# Altium PCB PCB1.PcbDoc
Units mm, origin at the board's own origin, x right, y up, seen from the top; angles counter-clockwise.
Board outline 55.25 x 50.25 mm, 4 copper layers (Top Layer 1, Top Layer, Bottom Layer, Bottom Layer 1), stack 0.742 mm thick; 31 components, 28 nets, 128 pads, 32 vias.
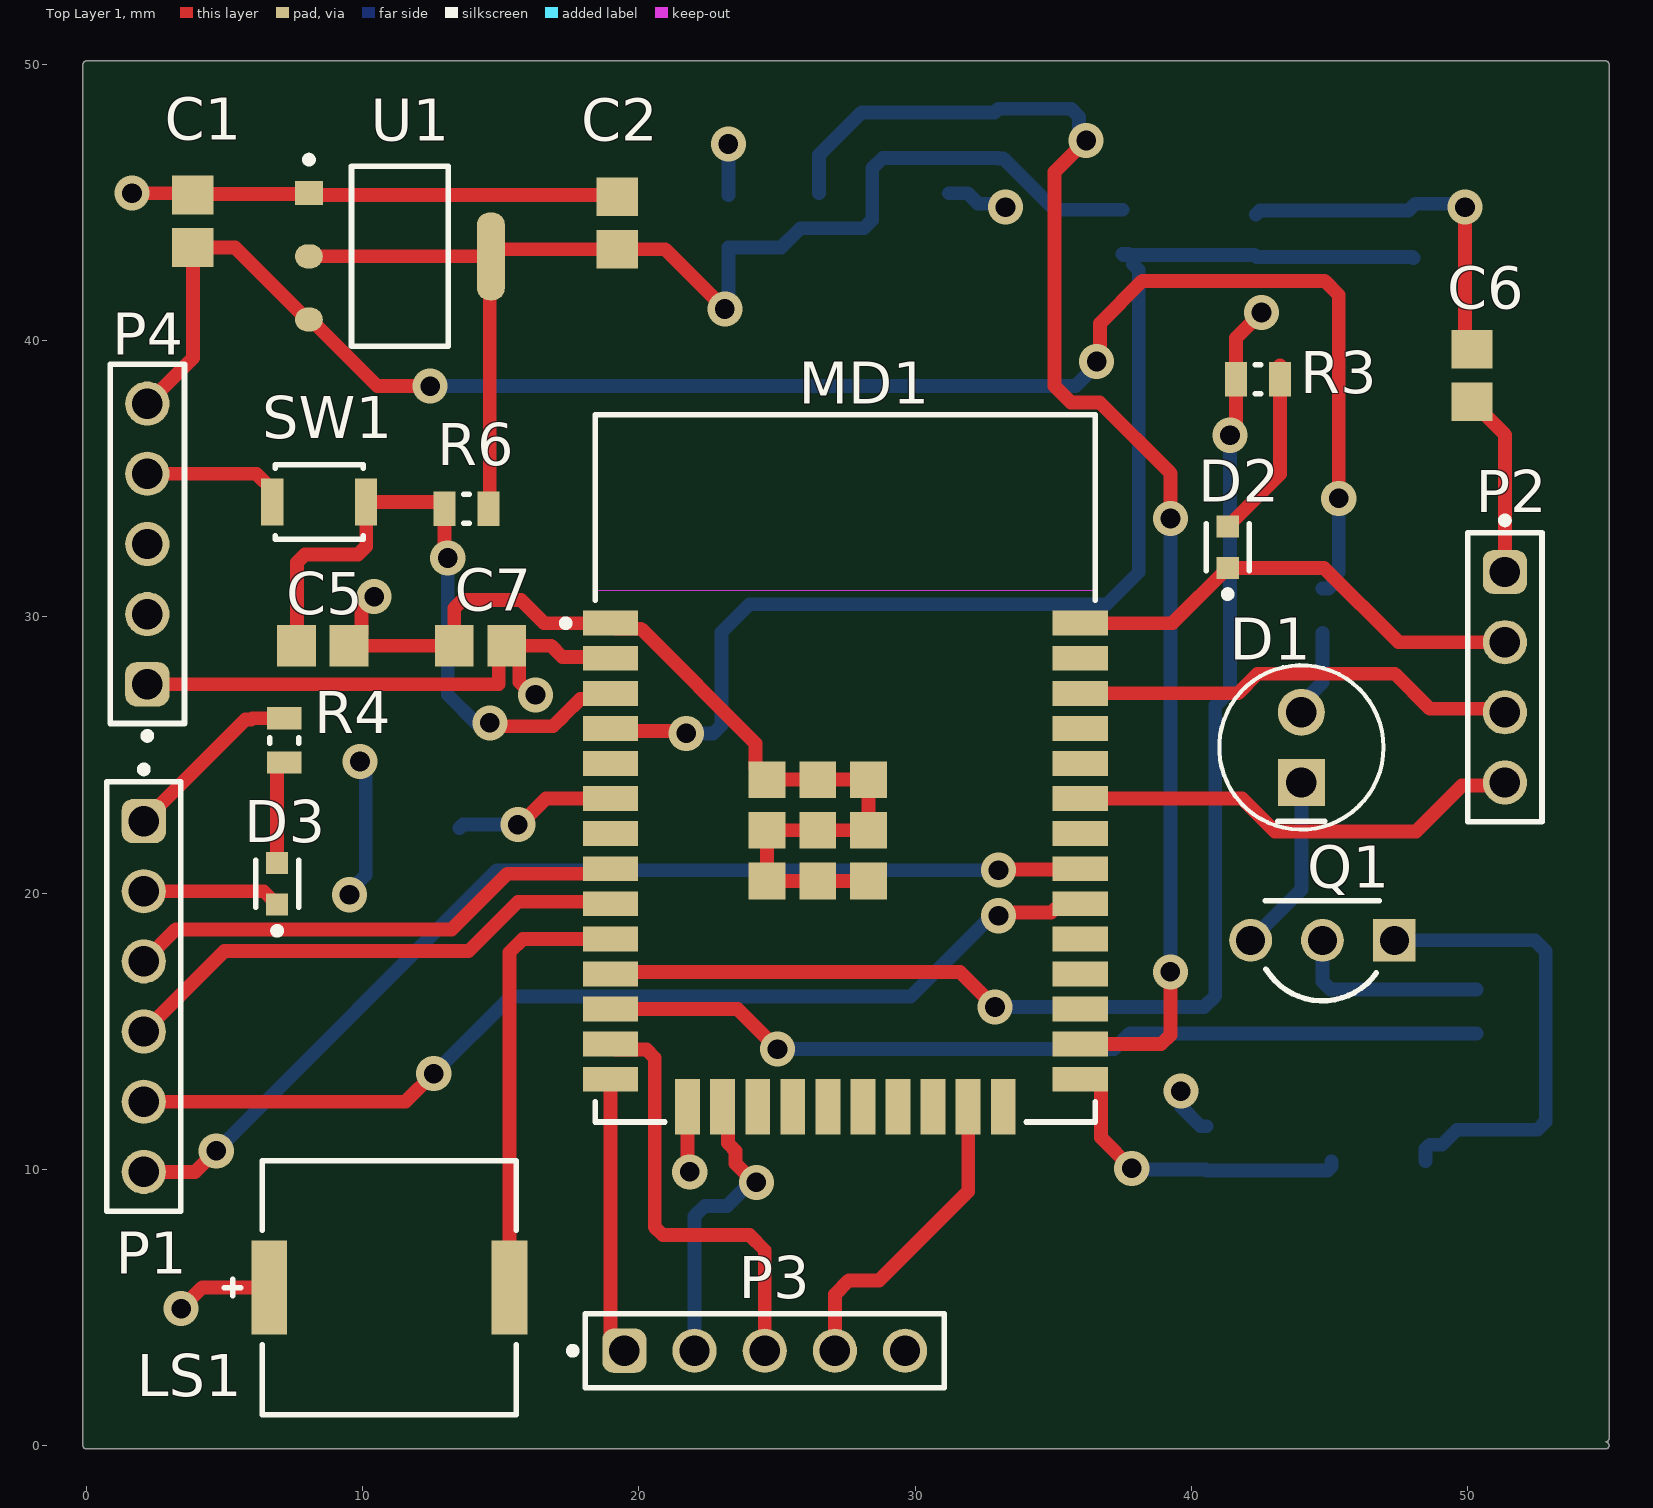
[diagram p0: Top Layer 1 view]
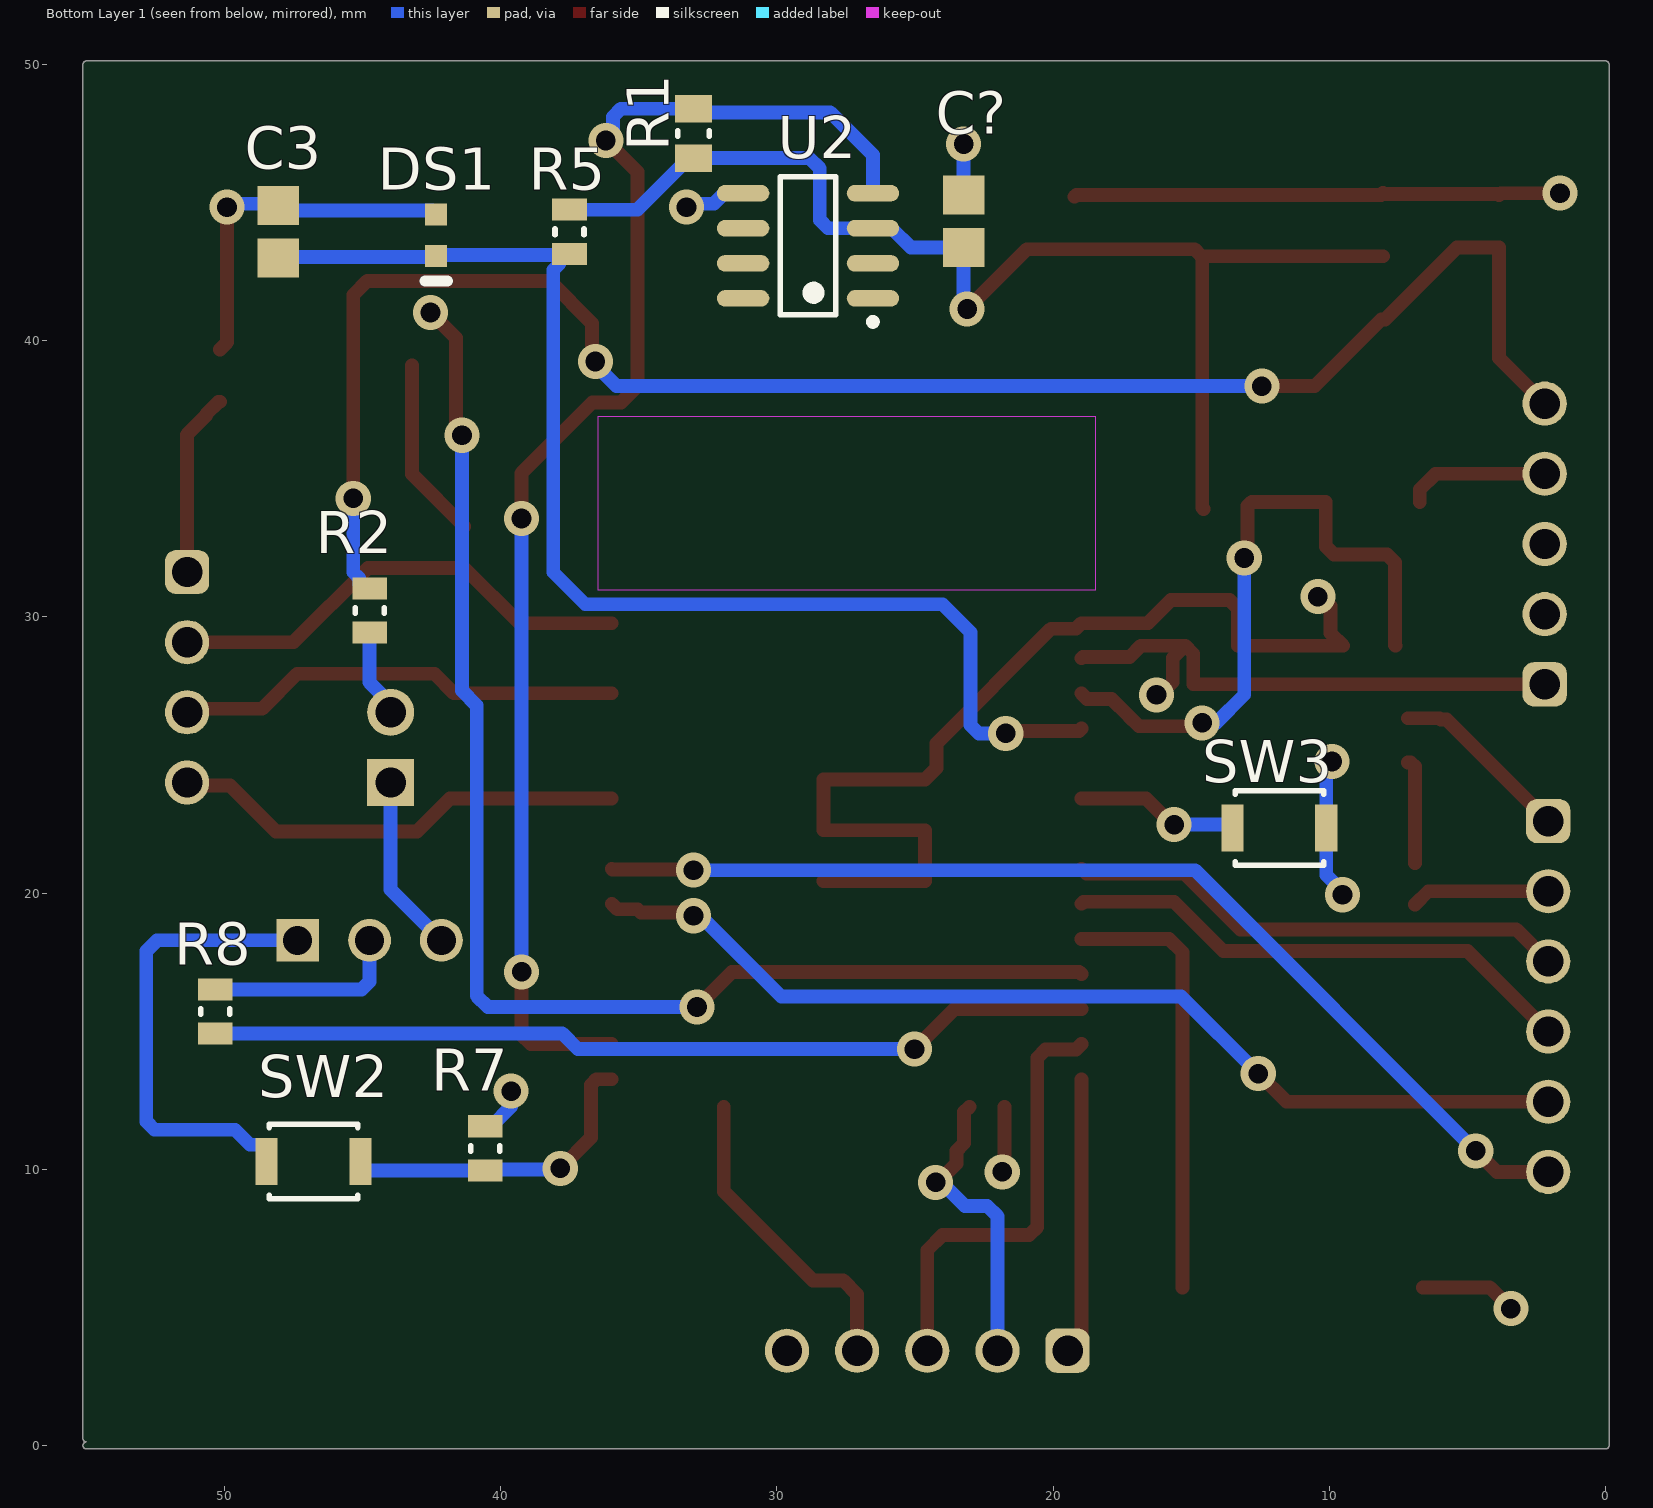
[diagram p1: Bottom Layer 1 view, seen from below]
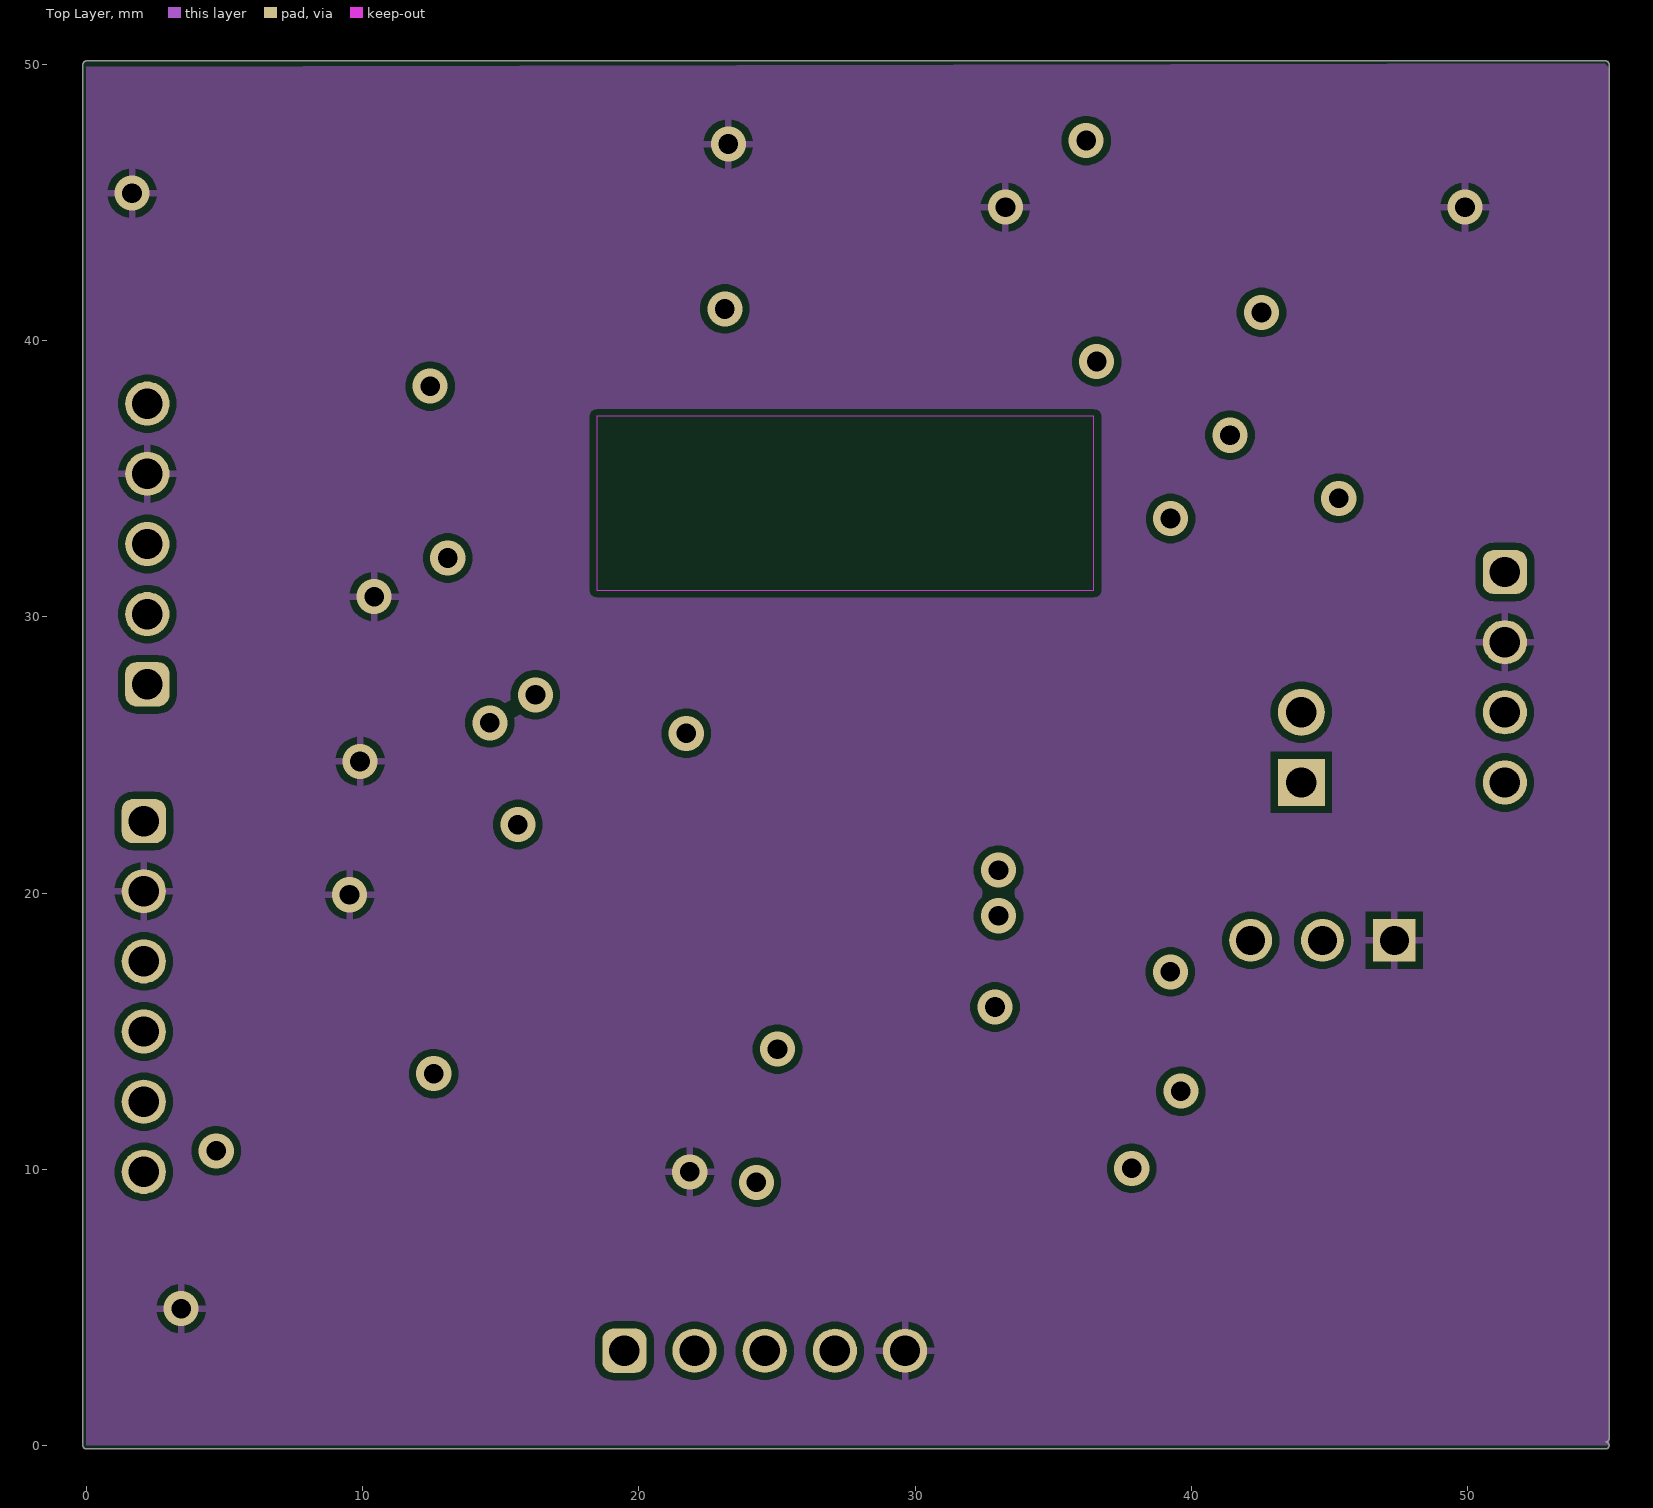
[diagram p2: Top Layer]
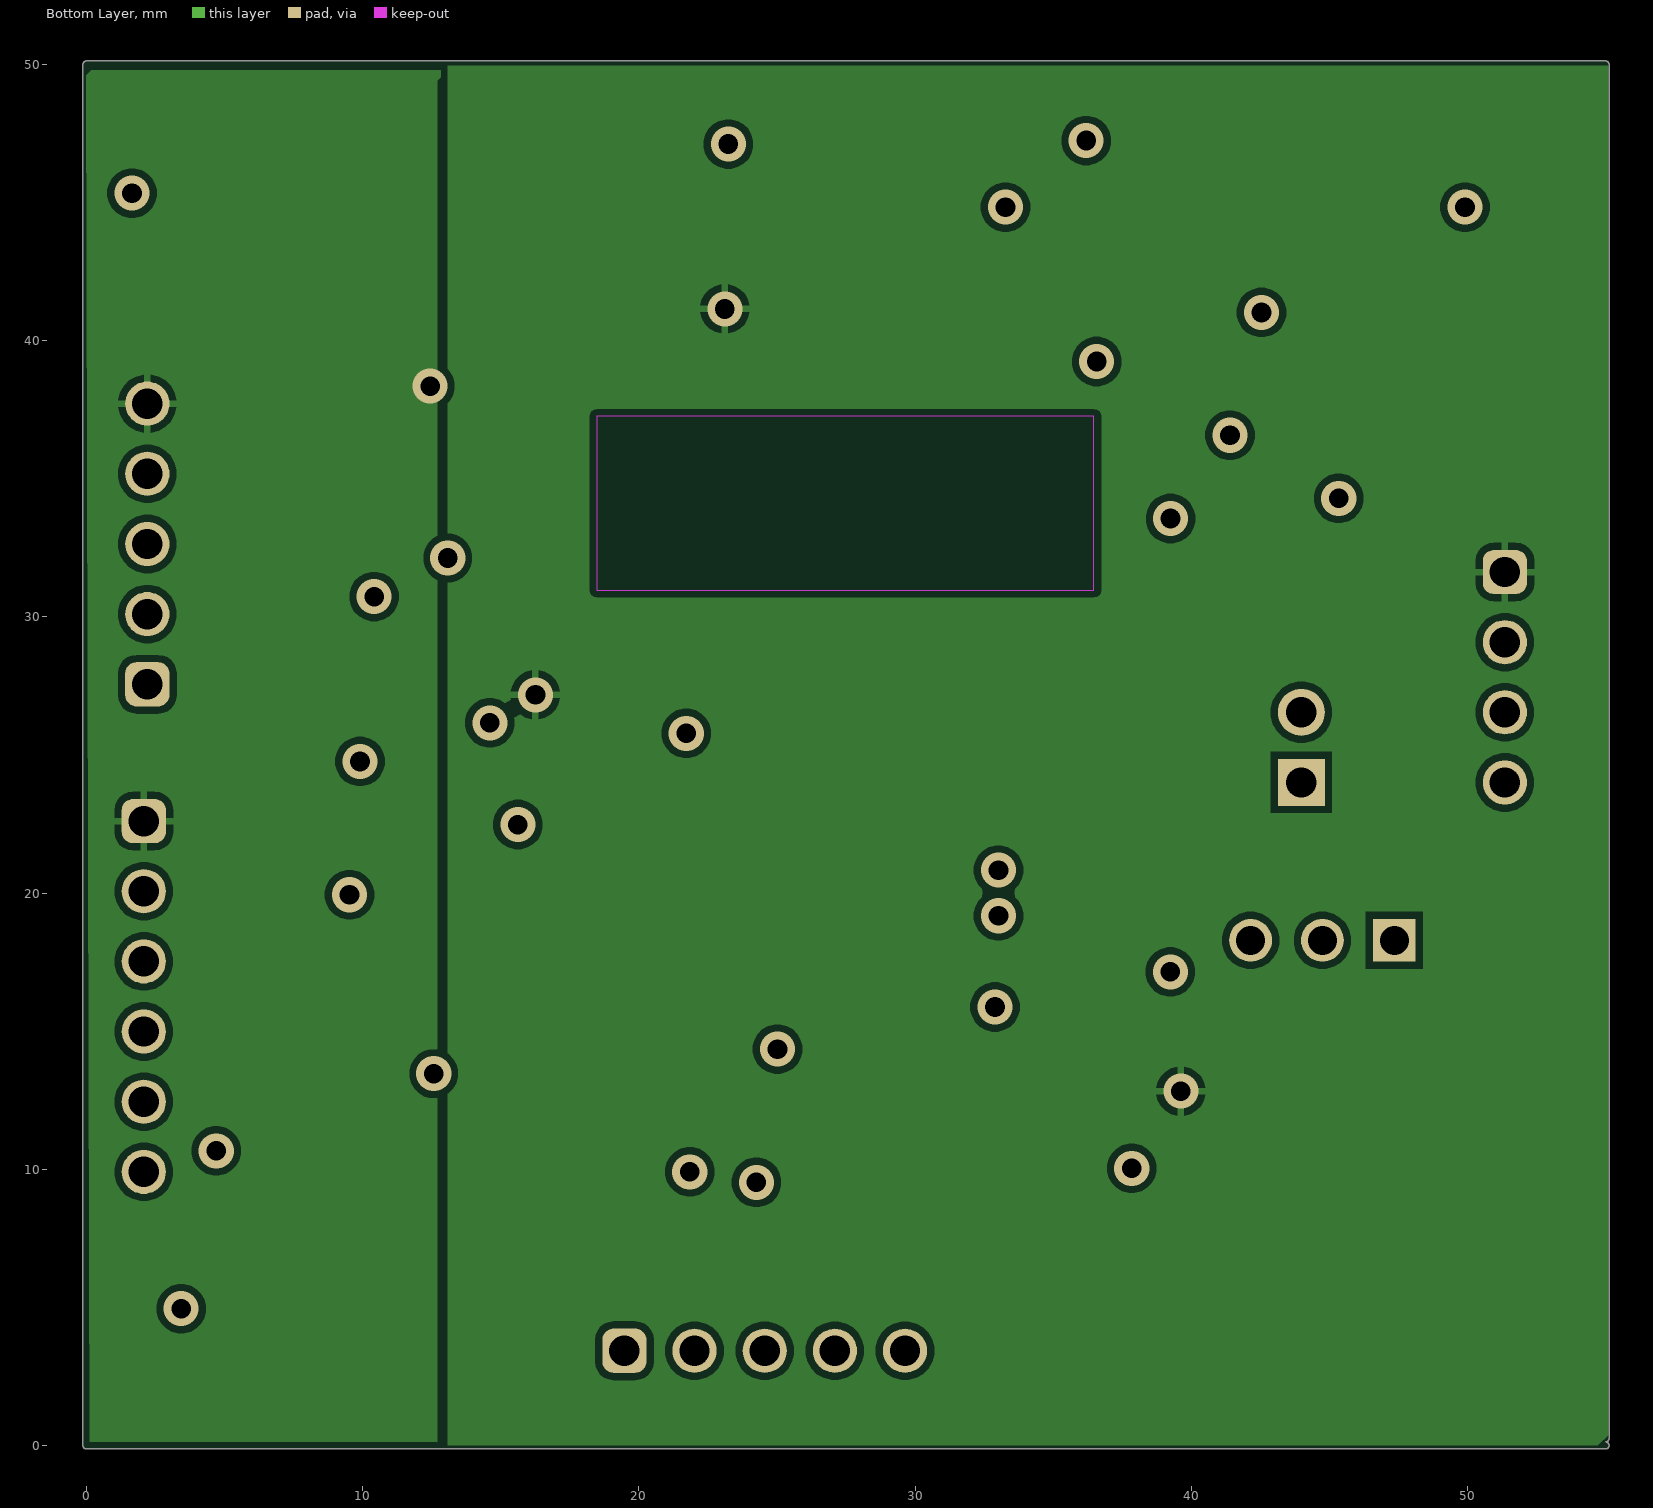
[diagram p3: Bottom Layer]
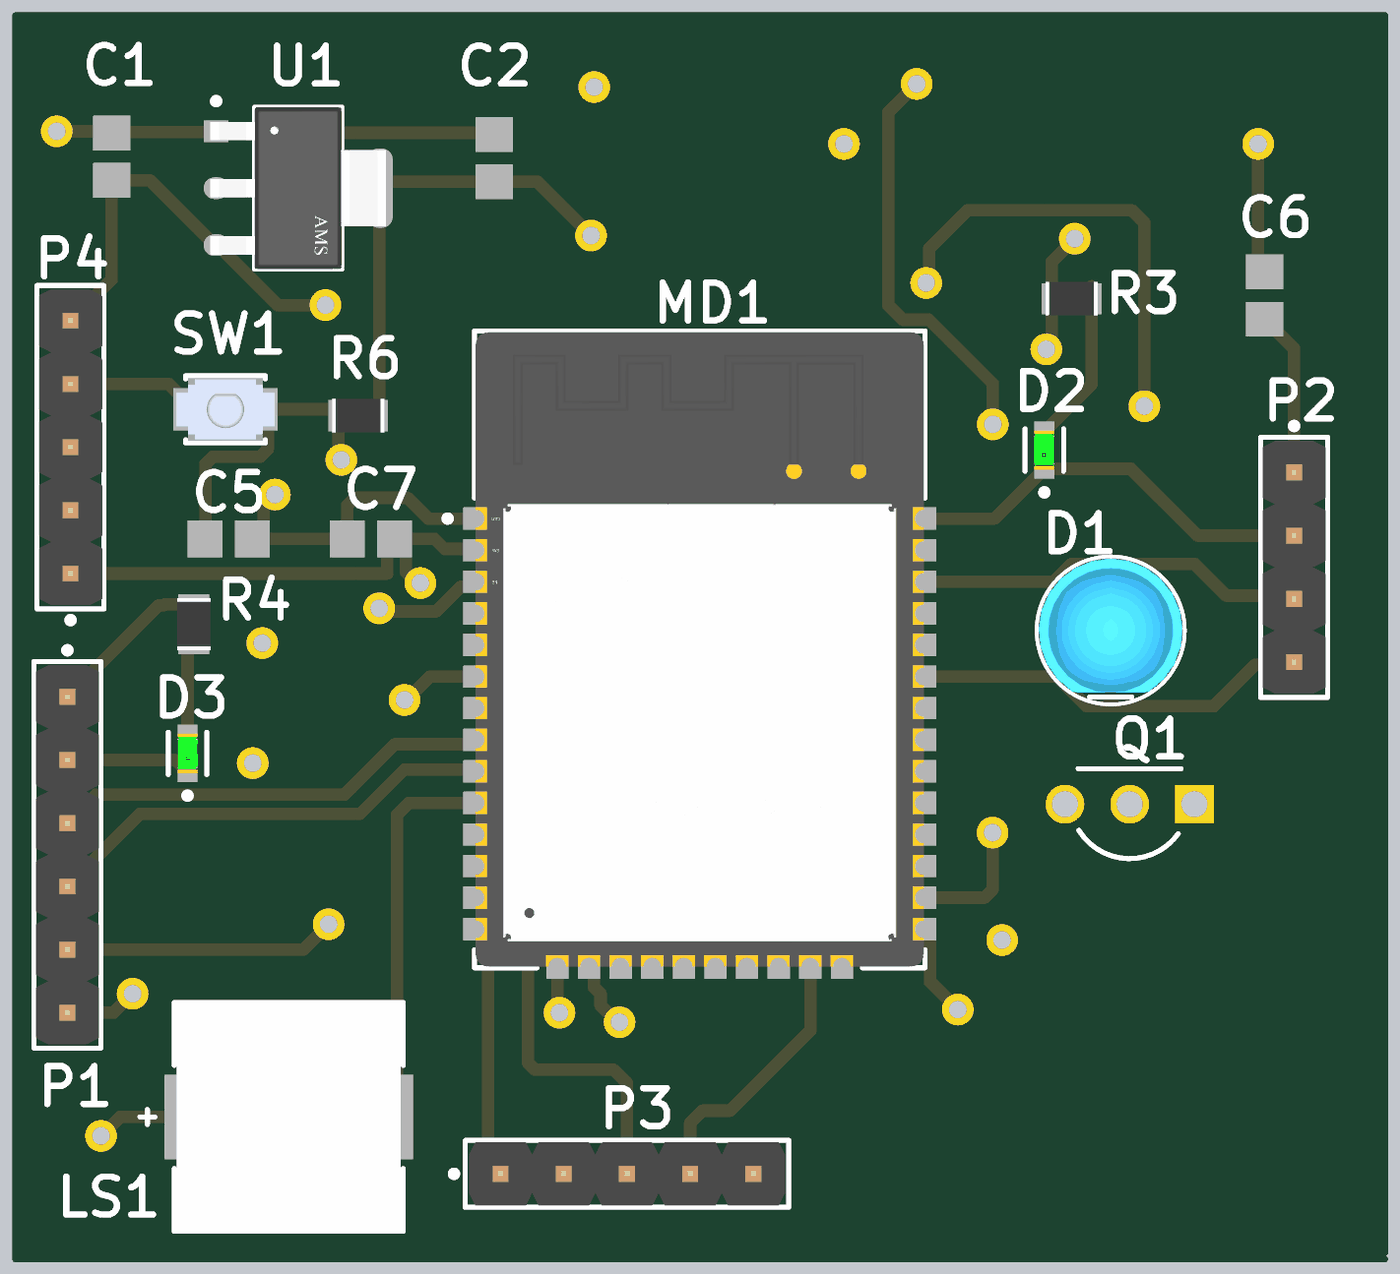
[diagram p4: 3D render of the assembled board from above, using the file's embedded part models]
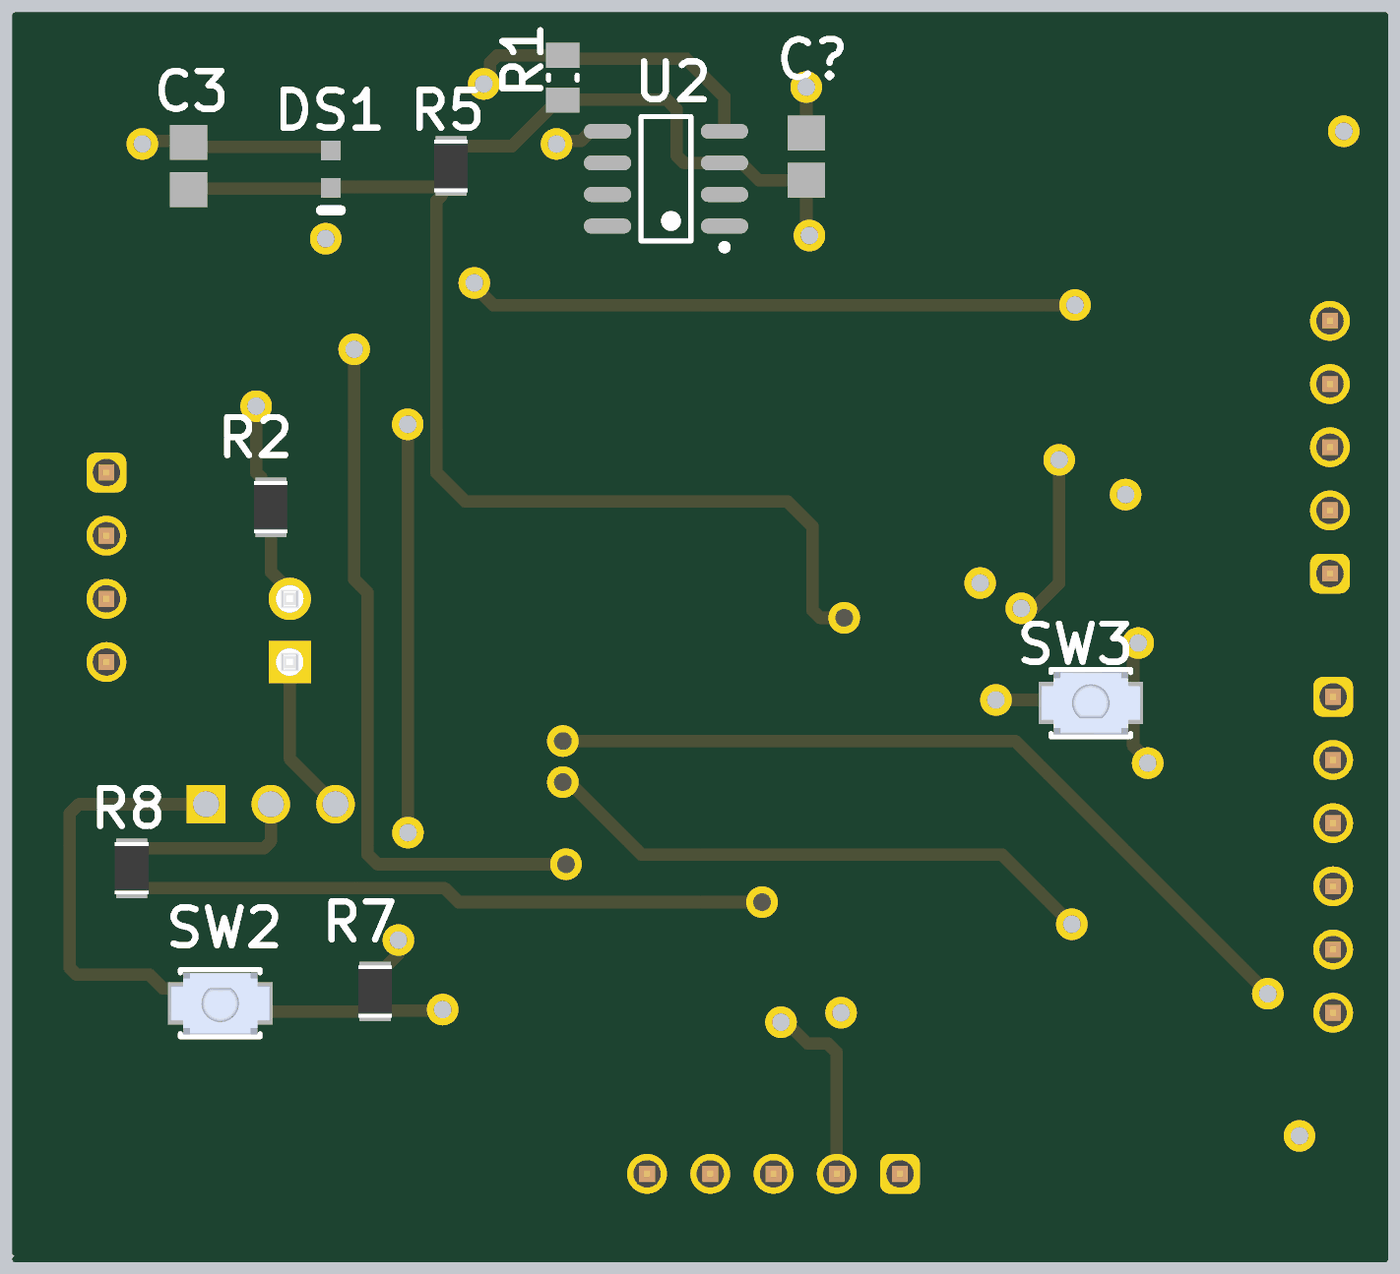
[diagram p5: 3D render of the assembled board from below, using the file's embedded part models]

## Layer stack, top to bottom
Top Solder: solder mask 0.0102, Solder Resist, Dk 3.5
Top Layer 1: signal copper 0.07
Dielectric 2: prepreg 0.0711, PP-006, Dk 4.1
Top Layer: signal copper 0.07
Dielectric 1: dielectric 0.32, FR-4, Dk 4.8
Bottom Layer: signal copper 0.07
Dielectric 3: prepreg 0.0711, PP-006, Dk 4.1
Bottom Layer 1: signal copper 0.07
Bottom Solder: solder mask 0.0102, Solder Resist, Dk 3.5

## Board outline
0,-0.127 cw(c0,0) -0.127,0 -0.127,50 cw(c0,50) 0,50.127 55,50.127 cw(c55,50) 55.127,50 55.127,0.254 cw(c55,0.254) 55.01,0.127 cw(c55,0) 55.127,0 cw(c55,0) 55,-0.127

## Design rules (kind name [scope] priority, off if disabled: settings)
Clearance [All] p1: gap=0.254 ignorepadtopadclearanceinfootprint=FALSE
PolygonConnect [All] p1: connectstyle=Relief reliefconductorwidth=0.254 reliefentries=4 polygonreliefangle="90 Angle" airgapwidth=0.254
RoutingVias [All] p1: holewidth=0.711 width=1.27 viastyle="Through Hole" minholewidth=0.711 minwidth=1.27 maxholewidth=0.711 maxwidth=1.27
SolderMaskExpansion [All] p1: expansion=0 istentingtop=FALSE
SupplyNets "Schematic Supply Nets_2" [InNet('+5')] p1: voltage=0.000
SupplyNets "Schematic Supply Nets_1" [InNet('+3.3')] p2: voltage=0.000
SupplyNets "Schematic Supply Nets" [InNet('GND')] p3: voltage=0.000
Width [All] p1: maxlimit=5 minlimit=0.254 preferedwidth=0.5
30 further rules are at their usual default settings.

## Components (designator, comment, footprint, x,y, rotation, side; value= is the part's Value field where it differs from the comment)
C1 "0.1uF" CAPC2013X135X45ML10T25 3.856,44.323 r90 top
C2 "0.1uF" CAPC2013X135X45ML10T25 19.223,44.262 r90 top
C3 "0.1uF" CAPC2013X135X45ML10T25 48.052,43.942 r270 bottom
C5 "0.1uF" CAPC2013X135X45ML10T25 8.555,28.956 r0 top
C6 "0.1uF" CAPC2013X135X45ML10T25 50.165,38.735 r90 top
C7 "0.1uF" CAPC2013X135X45ML10T25 14.27,28.956 r0 top
C? "0.1uF" CAPC2013X135X45ML10T25 23.241,44.323 r270 bottom
D1 "TSAL6100" FP-6_544-5259_08-4-MFG 43.988,25.273 r90 top
D2 "LTST-C193KGKT-5A" FP-LTST-C193KGKT-5A-MFG 41.321,32.524 r90 top
D3 "LTST-C193KGKT-5A" FP-LTST-C193KGKT-5A-MFG 6.904,20.332 r90 top
DS1 "LTST-C190AKT" LTST-C190AKT-2_V 42.337,43.815 r270 bottom
LS1 "PKMCS0909E4000-R1" FP-PKMCS-MFG 10.968,5.715 r180 top
MD1 "ESP32-WROOM-32" FP-ESP32-WROOM-32-MFG 27.478,24.511 r0 top
P1 "61300611121" 61300611121 2.078,16.256 r270 top
P2 "61300411121" 61300411121 51.354,27.813 r270 top
P3 "61300511121" 61300511121 24.557,3.429 r0 top
P4 "61300511121" 61300511121 2.205,32.639 r90 top
Q1 "PN2222ATF" FAIR-TO-92-3 44.75,18.288 r180 top
R1 "4.7k" RESC2013X60X35NL10T20 33.02,47.498 r90 bottom
R2 "330" RESC2013X60X35LL10T20 44.75,30.226 r90 bottom
R3 "330" RESC2013X60X35LL10T20 42.418,38.608 r180 top
R4 "330" RESC2013X60X35LL10T20 7.158,25.527 r90 top
R5 "10k" RESC2013X60X35LL10T20 37.511,43.942 r90 bottom
R6 "10k" RESC2013X60X35LL10T20 13.762,33.909 r180 top
R7 "10k" RESC2013X60X35LL10T20 40.559,10.757 r270 bottom
R8 "1k" RESC2013X60X35LL10T20 50.338,15.71 r270 bottom
SW1 "B3U-1000P" FP-B3U-1000P-MFG 8.428,34.163 r0 top
SW2 "B3U-1000P" FP-B3U-1000P-MFG 46.782,10.287 r180 bottom
SW3 "B3U-1000P" FP-B3U-1000P-MFG 11.811,22.352 r0 bottom
U1 "AMS1117-3.3" FP-AMS1117-IPC_C 11.349,43.053 r0 top
U2 "DS18B20Z+" MAXM-S8+2_L 28.875,43.434 r0 bottom

## Footprints (in the part's own frame and the unit in brackets; to place one, negate y for a bottom-side part, rotate by r counter-clockwise, add the part's x,y. Pads: shape width x height; smd on the part's side, far side on the other; paste and mask are expansions set on the pad)
61300411121 [mm] "Pin Header, pitch 2.54 mm, THT, Vertical, single row, 4p"
  rrect50% 1.6x1.6 hole 1.1: 1(-3.81,0)
  round 1.6 hole 1.1: 2(-1.27,0) 3(1.27,0) 4(3.81,0)
  silkscreen extent -5.8,-1.35 5.23,1.35, body extent -5.08,-1.27 5.08,1.27, height 8.57
61300511121 [mm] "Pin Header, pitch 2.54 mm, THT, Vertical, single row, 5p"
  rrect50% 1.6x1.6 hole 1.1: 1(-5.08,0)
  round 1.6 hole 1.1: 2(-2.54,0) 3(0,0) 4(2.54,0) 5(5.08,0)
  silkscreen extent -7.07,-1.35 6.5,1.35, body extent -6.35,-1.27 6.35,1.27, height 8.57
61300611121 [mm] "Pin Header, pitch 2.54 mm, THT, Vertical, single row, 6p"
  rrect50% 1.6x1.6 hole 1.1: 1(-6.35,0)
  round 1.6 hole 1.1: 2(-3.81,0) 3(-1.27,0) 4(1.27,0) 5(3.81,0) 6(6.35,0)
  silkscreen extent -8.34,-1.35 7.77,1.35, body extent -7.62,-1.27 7.62,1.27, height 8.57
CAPC2013X135X45ML10T25 [mm] "Chip Capacitor, 2-Leads, Body 2.10x1.35mm, IPC Low Density"
  rect 1.4x1.5 smd: 1(-0.95,0) 2(0.95,0)
  body extent -1.05,-0.67 1.05,0.67, height 1.35
FAIR-TO-92-3 [mm] "TO, 3-Leads, Body Dia 4.79mm, Pitch 2.6mm"
  rect 1.55x1.55 hole 1.05: 1(-2.6,0)
  round 1.55 hole 1.05: 2(0,0) 3(2.6,0)
  silkscreen extent -2.07,-1.43 2.07,2.19, body extent -2.4,-1.47 2.4,2.2, height 8.49
FP-6_544-5259_08-4-MFG [mm]
  rect 1.7x1.7 hole 1.1 paste-2539.97 mask+0: 1(-1.27,0)
  round 1.7 hole 1.1 paste-2539.97 mask+0: 2(1.27,0)
  silkscreen extent -2.97,-2.98 2.97,2.97, body extent -3.08,-3.08 3.08,3.08, height 0.25
FP-AMS1117-IPC_C [mm]
  rect 1.004x0.872 smd paste+0 mask+0: 1(-3.295,2.29)
  rrect100% 1.004x0.872 smd paste+0 mask+0: 2(-3.295,0) 3(-3.295,-2.29)
  rrect87% 1.004x3.182 smd paste+0 mask+0: 4(3.295,0)
  silkscreen extent -3.42,-3.25 1.75,3.62, body extent -3.9,-3.35 3.9,3.35, height 0.25
FP-B3U-1000P-MFG [mm]
  rect 0.8x1.7 smd paste+0 mask+0: 1(-1.7,0) 2(1.7,0)
  silkscreen extent -1.6,-1.35 1.6,1.35, body extent -2.2,-1.45 2.2,1.45, height 0.25
FP-ESP32-WROOM-32-MFG [mm]
  rect 2x0.9 smd paste+0 mask+0: 1(-8.5,5.26) 2(-8.5,3.99) 3(-8.5,2.72) 4(-8.5,1.45) 5(-8.5,0.18) 6(-8.5,-1.09) 7(-8.5,-2.36) 8(-8.5,-3.63) 9(-8.5,-4.9) 10(-8.5,-6.17) 11(-8.5,-7.44) 12(-8.5,-8.71) 13(-8.5,-9.98) 14(-8.5,-11.25) 25(8.5,-11.25) 26(8.5,-9.98) 27(8.5,-8.71) 28(8.5,-7.44) 29(8.5,-6.17) 30(8.5,-4.9) 31(8.5,-3.63) 32(8.5,-2.36) 33(8.5,-1.09) 34(8.5,0.18) 35(8.5,1.45) 36(8.5,2.72) 37(8.5,3.99) 38(8.5,5.26)
  rect 0.9x2 smd paste+0 mask+0: 15(-5.715,-12.25) 16(-4.445,-12.25) 17(-3.175,-12.25) 18(-1.905,-12.25) 19(-0.635,-12.25) 20(0.635,-12.25) 21(1.905,-12.25) 22(3.175,-12.25) 23(4.445,-12.25) 24(5.715,-12.25)
  rect 1.33x1.33 smd paste+0 mask+0: 39(-2.835,-4.075) 39(-2.835,-2.24) 39(-2.835,-0.405) 39(-1,-4.075) 39(-1,-2.24) 39(-1,-0.405) 39(0.835,-4.075) 39(0.835,-2.24) 39(0.835,-0.405)
  Keep-Out Layer region: -9,6.45 9,6.45 9,12.75 -9,12.75
  Keep-Out Layer region: -9,6.45 9,6.45 9,12.75 -9,12.75
  silkscreen extent -10.25,-12.8 9.05,12.8, body extent -9.6,-13.35 9.6,12.9, height 0.25
FP-LTST-C193KGKT-5A-MFG [mm]
  rect 0.8x0.8 smd paste+0 mask+0: 1(-0.75,0) 2(0.75,0)
  silkscreen extent -1.82,-0.77 0.85,0.77, body extent -1.25,-0.55 1.25,0.55, height 0.25
FP-PKMCS-MFG [mm]
  rect 1.3x3.4 smd paste+0 mask+0: 1(-4.35,0) 2(4.35,0)
  silkscreen extent -4.6,-4.6 5.97,4.6, body extent -5.1,-4.7 5.1,4.7, height 0.25
LTST-C190AKT-2_V [mm] "SMD, 2-Leads, Body 1.6x0.8mm"
  rect 0.8x0.8 smd: 1(-0.75,0) 2(0.75,0)
  silkscreen extent 1.65,-0.4 1.65,0.4, body extent -0.8,-0.4 0.8,0.4, height 0.8
MAXM-S8+2_L [mm] "SOIC, 8-Leads, Body 4.90x3.90mm, Pitch 1.27mm, IPC High Density"
  oval 1.9x0.6 smd: 1(-2.35,1.905) 2(-2.35,0.635) 3(-2.35,-0.635) 4(-2.35,-1.905) 5(2.35,-1.905) 6(2.35,-0.635) 7(2.35,0.635) 8(2.35,1.905)
  silkscreen extent -2.47,-2.5 1,2.88, body extent -2,-2.5 2,2.5, height 1.75
RESC2013X60X35LL10T20 [mm] "Chip Resistor, 2-Leads, Body 2.1x1.35mm, IPC High Density"
  rect 0.8x1.25 smd: 1(-0.8,0) 2(0.8,0)
  silkscreen extent -0.1,-0.53 0.1,0.53, body extent -1.05,-0.67 1.05,0.68, height 0.6
RESC2013X60X35NL10T20 [mm] "Chip Resistor, 2-Leads, Body 2.00x1.25mm, IPC Medium Density"
  rect 1x1.35 smd: 1(-0.9,0) 2(0.9,0)
  silkscreen extent -0.1,-0.58 0.1,0.58, body extent -1.05,-0.67 1.05,0.67, height 0.6

## Part data
C1 C2 C3 C5 C6 C7 C?: library part CMP-2000-04946-1, "Multilayer Ceramic Capacitor, 1 uF, +/- 10%, 16 V, -55 to 125 degC, 0805 (2012 Metric), RoHS, Tape and Reel", Capacitance=1µF, Case Size/Dimension=0805, Dielectric=X7R, Manufacturer=Murata, Package Description="2-Pin Surface Mount Device, Body 2 x 1.25 mm", Package Reference=805, Rated Voltage=16V, Tolerance (%)=±10%, Datasheet URL=https://datasheet.ciiva.com/34302/1858922-34302874.pdf, Datasheet Version=Mar-08, Manufacturer URL=http://www.murata.com/
D1: library part CMP-02520-000005-1, "EMITTER IR 940NM 100MA RADIAL", Ambient Temperature Range High=+85°C, Ambient Temperature Range Low=-40°C, Colour=Infrared, Forward Current=100mA, Forward Voltage=1.35V, Manufacturer=Vishay, Max Junction Temp=+100°C, Package=6.544-5259.08-4, Power Dissipation=160mW, Reverse Voltage=5V, Temperature="-40°C to +85°C", Automotive=No, Category=Diode, ComponentLink2Description=Datasheet, ComponentLink2URL=http://www.vishay.com/docs/81009/tsal6100.pdf, Device Class L1=Optoelectronics, Device Class L2=LEDs, Device Class L3=unset, Digikey Description="EMITTER IR 940NM 100MA RADIAL", Ipc Land Pattern Name=DIORD254W110D580H900, Lead Free=Yes, Led Orientation=Straight, Manufacturer Part Number=TSAL6100, Mouser Description="TSAL6100 Series 950 nm 100 mA Through Hole Infrared Emitting Diode - T-1 3/4", Octopart=https://octopart.com/tsal6100-vishay-39643276, Peak Emmision Wavelength=940nm, RoHS=TRUE, Temperature Range High=+85°C, Temperature Range Low=-40°C, Viewing Angle=20°
D2 D3: library part CMP-2000-06622-2, "LED GREEN CLEAR CHIP SMD", Case Code (Imperial)=0603, Case Code (Metric)=1608, Color=Green, Forward Current=30mA, Forward Voltage=2.3V, Lens Color=Colorless, Max Operating Temperature=85°C, Min Operating Temperature=-55°C, Package Quantity=3000, Power Dissipation=75mW, Reverse Voltage=5V, Test Current=5mA, Case/Package=0603, Depth=0.8mm, Dominant Wavelength=576.5nm, Height=0.35mm, Illumination Color=Green, Lead Free="Lead Free", Length=1.6mm, Lens Style=Diffused, Lens Transparency=Clear, Luminous Intensity=28mcd, Mount="Surface Mount", Number of Elements=1, Number of LEDs=1, Number of Pins=2, Packaging="Tape and Reel", Power Rating=75mW, Radiation Hardening=No, Viewing Angle=130°, Width=0.8mm
DS1: library part CMP-007-00021-2, "LED Uni-Color Orange, 100 mW, 30 mA, -55 to 85 degC, 2-Pin SMD, RoHS, Tape and Reel", Case/Package=0603, Colour=Orange, Forward Current=20mA, Forward Voltage=2.1V, Manufacturer=Lite-On, Max Operating Temperature=85°C, Min Operating Temperature=-55°C, Package Description="2-Pin Surface Mount Device, Body 1.6 x 0.8 mm", Package Quantity=3000, Package Reference=LTST-C190AKT-2, Datasheet URL=http://datasheet.octopart.com/LTST-C190AKT-Lite-On-datasheet-11729267.pdf, Datasheet Version=Jan-03, Illumination Colour=Orange, Lens Style=Clear, Luminous Intensity=2mcd, Manufacturer URL=http://www.us.liteon.com/, Mounting Technology=SM, Nominal Vf=2.1V, Packaging=TapeandReel, Pins=2, RoHS Compliant=True, Viewing Angle=130degrees
LS1: library part CMP-2000-05252-2, "AUDIO PIEZO TRANSDUCER 12.5V SMD", Frequency=4kHz, Max Operating Temperature=85°C, Max Supply Voltage (DC)=12.5V, Min Operating Temperature=-40°C, Min Supply Voltage (DC)=-12.5V, Package Quantity=2000, Voltage Rating=1.5V, Depth=9mm, Height=1.9mm, Lead Free="Lead Free", Length=9mm, Mount="Surface Mount", Packaging="Tape and Reel", Radiation Hardening=No, REACH SVHC="No SVHC", Self Resonant Frequency=4kHz, Termination=Solder, Voltage Rating (DC)=12.5V, Width=9mm
MD1: library part CMP-194065-000008-1, "RX TXRX MOD WIFI SURFACE MOUNT", Case/Package=SMD/SMT, Frequency=2.5GHz, Max Operating Temperature=85°C, Min Operating Temperature=-40°C, Operating Supply Voltage=3.6V, Package Quantity=550, Data Rate=150Mbps, Mount="Surface Mount", Packaging="Cut Tape", Sensitivity=-98dBm, Weight=0.088185oz
P1: library part CMP-1502-01070-4, "THT Vertical Pin Header WR-PHD, Pitch 2.54 mm, Single Row, 6 pins", Color=Black, Contact Resistance=20mΩ, Current Rating=3A, Max Operating Temperature=105°C, Min Operating Temperature=-40°C, Operating Supply Voltage=250V, Connector Type="Male Pin", Contact Gender=Male, Contact Material=Gold, Contact Mating Length=5.9944mm, Contact Plating=Gold, Gender=Male, Height=8.89mm, Housing Material=PBT, Lead Free="Lead Free", Lead Pitch=2.54mm, Mount="Through Hole", Number of Contacts=6, Number of Pins=6, Number of Positions=6, Number of Rows=1, Orientation=Vertical, Packaging=Bulk, Pitch=2.54mm, RoHS=Compliant, Termination="Through Hole", Voltage Rating=250V
P2: library part CMP-1502-01064-4, "THT Vertical Pin Header WR-PHD, Pitch 2.54 mm, Single Row, 4 pins", Color=Black, Contact Resistance=20mΩ, Current Rating=3A, Max Operating Temperature=105°C, Min Operating Temperature=-40°C, Operating Supply Voltage=250V, Connector Type="Male Pin", Contact Material=Gold, Contact Mating Length=5.9944mm, Contact Plating=Gold, Gender=Male, Height=8.89mm, Lead Free="Lead Free", Lead Pitch=2.54mm, Mount="Through Hole", Number of Contacts=4, Number of Pins=4, Number of Positions=4, Number of Rows=1, Orientation=Vertical, Packaging=Bulk, Pitch=2.54mm, RoHS=Compliant, Termination=Solder, Voltage Rating=250V
P3 P4: library part CMP-1502-01068-4, "THT Vertical Pin Header WR-PHD, Pitch 2.54 mm, Single Row, 5 pins", Color=Black, Contact Resistance=20mΩ, Current Rating=3A, Max Operating Temperature=105°C, Min Operating Temperature=-40°C, Operating Supply Voltage=250V, Connector Type="Male Pin", Contact Material=Gold, Contact Mating Length=5.9944mm, Contact Plating=Gold, Gender=Male, Height=8.89mm, Lead Free="Lead Free", Lead Pitch=2.54mm, Mount="Through Hole", Number of Contacts=5, Number of Pins=5, Number of Positions=5, Number of Rows=1, Orientation=Vertical, Packaging=Bulk, Pitch=2.54mm, RoHS=Compliant, Termination=Solder, Voltage Rating=250V
Q1: library part CMP-2000-06911-1, "NPN General-Purpose Amplifier, 40 V, -55 to 150 degC, 3-Pin TO-92, RoHS, Tape and Reel", Collector- Base Voltage VCBO=75V, Collector- Emitter Voltage VCEO Max=40V, Collector-Emitter Saturation Voltage=1V, DC Current Gain hFE Max=300, Emitter- Base Voltage VEBO=6V, Manufacturer=FairchildSemiconductor, Maximum DC Collector Current=1A, Maximum Operating Temperature=+150C, Maximum Power Dissipation=625mW, Minimum Operating Temperature=-55C, Package / Case=TO-92-3KinkedLead, Package Description="3-Pin Transistor Outline Package, Body Dia 4.79 mm, Pitch 2.6 mm", Package Reference=TO-92, <PCN>=http://www.mouser.com/PCN/3.26.10LTBDFairchild.pdf, Brand=FairchildSemiconductor, Configuration=Single, Datasheet URL=https://www.fairchildsemi.com/datasheets/PN/PN2222A.pdf, Datasheet Version="Rev. 1.1.0, 07/2014", DC Collector/Base Gain hfe Min=100, Factory Pack Quantity=2000, Gain Bandwidth Product fT=300MHz, Manufacturer URL=https://www.fairchildsemi.com/, Mounting Style=ThroughHole, Mounting Technology=ThroughHole, Packaging=Reel, Product Category=BipolarTransistors-BJT, RoHS=Details, Series=PN2222, Transistor Polarity=NPN, Unit Weight=0.008466oz
R1: library part CMP-2001-01226-1, Manufacturer=Yageo, Part Number=RC0805FR-0761R9L
R2 R3 R4 R5 R6 R7 R8: library part CMP-2000-06960-1, "Chip Resistor, 330 Ohm, +/- 1%, 125 mW, -55 to 155 degC, 0805 (2012 Metric), RoHS, Tape and Reel", Case Code - in=0805, Case Code - mm=2012, Manufacturer=Yageo, Operating Temperature Range=-55Cto+155C, Package Description="2-Pin Surface Mounted Device, Body 2 x 1.25 mm", Power Rating=125mW(1/8W), Resistance=330Ohms, Temperature Coefficient=100PPM/C, Tolerance=1%, Voltage Rating=150V, Datasheet URL=http://www.yageo.com/documents/recent/PYu-RC_Group_51_RoHS_L_7.pdf, Datasheet Version="Rev. 7, 05/2017", Manufacturer URL=http://www.yageo.com/, Mounting Technology=SurfaceMount, Package Reference=0805, Packaging=Reel, Product=ThickFilmResistorsGeneralPurpose, Series=RC, Termination Style=SMD/SMT
SW1 SW2 SW3: library part CMP-2100-03586-2, "SWITCH TACTILE SPST-NO 0.05A 12V", Contact Current Rating=50mA, Contact Resistance=100mR, Insulation Resistance=100MR, Max Operating Temperature=70°C, Max Voltage Rating (DC)=12V, Min Operating Temperature=-25°C, Operating Force=1.5N, Package Quantity=1, Ratings="Dust Proof", Actuator Length=0.4mm, Actuator Type=Standard, Contact Material=Silver, Current Rating=50mA, Depth=2.5mm, Electrical Life=200000Cycles, Height=1.2mm, Illumination Type=Non-Illuminated, Lead Free="Lead Free", Length=4mm, Max Current Rating=50mA, Mechanical Life=200000Cycles, Mount="Surface Mount", Orientation=Straight, Packaging="Tape and Reel", Switch Function=Off-Mom, Switch Travel=0.15mm, Termination=SMD/SMT, Throw Configuration=SPST, Voltage Rating (DC)=12V, Weight=0.000776oz, Width=3mm
U1: library part CMP-209535-000001-1, "LDO Voltage Regulators 1A, 3.3V", Dropout Voltage=1.1V, Manufacturer="Advanced Monolithic Systems", Max Junction Temp=+125°C, Max Power Dissipation=1.2W, Max Supply Voltage=15V, Nominal Supply Current=5mA, Output Current=1A, Output Voltage=3.3V, Package=AMS1117, Temperature="-40°C to +125°C", Temperature Range Low=-40°C, Automotive=No, Category=IC, ComponentLink2Description=Datasheet, ComponentLink2URL=http://www.advanced-monolithic.com/pdf/ds1117.pdf, Device Class L1="Integrated Circuits (ICs)", Device Class L2="Power Management ICs", Device Class L3="Voltage Regulators - Linear", Height=1.8mm, Ipc Land Pattern Name=SOT229P700X180-4, Lead Free=Yes, Manufacturer Part Number=AMS1117-3.3, Number Of Outputs=1, Octopart=https://octopart.com/ams1117-3.3-advanced+monolithic+systems-25899300, Output Type=Fixed, RoHS=TRUE, Standoff Height=0.64mm, Temperature Range High=+125°C
U2: library part CMP-0253-00019-2, "High-Precision 1-Wire Digital Thermometer, -55 to 125 degC, 8-Pin SOIC (S8+2), Pb-Free", Generic Part Number=DS18B20, Temp. Thresh.="Programmable (NV)", Code_JEDEC=MS012, ComponentLink1Description="Manufacturer URL", ComponentLink1URL=http://www.maximintegrated.com/, ComponentLink2Description=Datasheet, ComponentLink2URL=http://datasheets.maximintegrated.com/en/ds/DS18B20.pdf, ComponentLink3Description="Package Specification", ComponentLink3URL=http://pdfserv.maximintegrated.com/package_dwgs/21-0041.PDF, DatasheetVersion="Rev. 4", Interface=1-Wire, Mounting Technology="Surface Mount", Multi Droppable=Yes, PackageDescription="8-Pin Small-Outline IC, Narrow (0.15in) (S8+2), Body 4.90 x 3.90 mm, Pitch 1.27 mm", PackageReference=S8+2, PackageVersion="Rev. D, 10/2012", Parasite Pwr.=Yes, PartNumber=DS18B20Z+, RoHS=Pb-Free, Sensor Type=Local

## Via types
v1: diameter 1.27, hole 0.711, Top Layer 1 to Bottom Layer 1, 31 vias
v2: diameter 1.272, hole 0.711, Top Layer 1 to Bottom Layer 1, 1 vias

## Nets (pads, with @x,y where several pads share a name; then routed paths per layer and width w, separated by ;. In a path a pad name is that pad's centre, name@x,y a point inside that pad or via, vN(x,y) a via of type N, cw(c..) or ccw(c..) an arc to the next point about the centre after c; other vN are vias at no path point)
+3.3: C2.1 C6.1 C7.2 C?.2 MD1.2 P2.1 P4.1 R1.1 R5.2 R6.1 R7.1 U1.2 U1.4 U2.3 | length 73.4
  Top Layer 1 w0.5: P4.1 14.927,27.559 14.927,28.663 C7.2 ; U1.2 U1.4 14.603,43.012 14.603,33.95 R6.1 ; U1.4@14.644,43.074 14.882,43.312 C2.1 20.95,43.312 v1(23.114,41.148) ; v1@16.002,27.305 15.67,27.637 15.67,28.506 C7.2 ; MD1.2 18.929,28.55 17.228,28.55 16.822,28.956 C7.2 ; C6.1 50.215,37.785 50.665,37.335 50.665,37.285 51.354,36.596 P2.1
  Bottom Layer 1 w0.5: v1(23.114,41.148) 23.241,41.275 C?.2 25.152,43.373 25.848,44.069 U2.3 28.155,44.069 28.448,44.362 28.448,46.228 28.829,46.609 33.009,46.609 R1.1 33.195,46.598 35.051,44.742 R5.2 ; v1@39.624,12.573 39.624,12.267 40.334,11.557 R7.1
  other v1: 39.624,12.827 16.256,27.178
+5: C1.1 P1.1 P4.5 R2.2 R4.2 U1.3 | length 69.6
  Top Layer 1 w0.5: P1.1 5.761,26.289 5.969,26.289 6.007,26.327 R4.2 ; P4.5 3.856,39.37 C1.1 5.378,43.373 7.988,40.763 8.12,40.763 10.529,38.354 v1(12.446,38.354) ; v1(36.576,39.243) 36.691,39.358 36.691,40.628 38.223,42.16 44.835,42.16 45.339,41.656 v1(45.339,34.29)
  Bottom Layer 1 w0.5: v1(12.446,38.354) 35.814,38.354 v1@36.322,38.862 ; R2.2 44.975,31.026 45.125,31.176 45.125,31.401 45.339,31.615 v1(45.339,34.29)
GND: C1.2 C2.2 C3.1 C5.2 C6.2 C7.1 C?.1 D2.1 D3.1 DS1.1 LS1.2 MD1.1 MD1.15 MD1.38 MD1.39 P1.2 P2.2 P3.5 P4.4 Q1.1 SW1.1 SW2.1 SW3.1 U1.1 U2.5 | length 124.8
  Top Layer 1 w0.5: v1(1.651,45.339) 3.79,45.339 C1.2 3.891,45.308 8.019,45.308 U1.1 8.12,45.277 19.158,45.277 C2.2 ; P1.2 6.42,20.066 D3.1 ; P4.4 6.162,35.179 6.728,34.613 SW1.1 ; v1(3.429,4.953) 4.191,5.715 LS1.2 ; v1@10.16,30.607 9.955,30.402 9.955,29.406 C5.2 C7.1 13.32,30.314 13.613,30.607 15.732,30.607 16.568,29.771 MD1.1 19.178,29.571 20.071,29.571 24.228,25.414 24.228,24.521 24.643,24.106 26.478,24.106 28.313,24.106 28.313,22.271 26.478,22.271 24.643,22.271 24.643,20.436 26.478,20.436 MD1.39@28.313,20.436 ; v1@21.717,10.287 21.763,10.333 MD1.15 ; MD1.38 39.318,29.771 D2.1 44.807,31.774 47.498,29.083 P2.2 ; v1(49.911,44.831) 49.911,39.939 C6.2
  Bottom Layer 1 w0.5: v1@9.779,20.32 10.111,20.652 SW3.1 10.111,24.433 v1@10.033,24.511 ; C?.1 v1(23.241,47.117) ; U2.5 31.902,45.339 32.283,44.958 v1@32.766,44.958 ; DS1.1 42.487,44.715 47.875,44.715 C3.1 48.118,44.958 v1@49.657,44.958 ; Q1.1 52.451,18.288 52.832,17.907 52.832,11.723 52.539,11.43 49.625,11.43 49.082,10.887 48.632,10.887 48.482,10.737 SW2.1
  other v1: 21.844,9.906 9.525,19.939 9.906,24.765 10.414,30.734 33.274,44.831
NetC3_2: C3.2 DS1.2 MD1.4 R5.1 | length 46.1
  Top Layer 1 w0.5: MD1.4 19.068,25.871 21.627,25.871 v1(21.717,25.781)
  Bottom Layer 1 w0.5: v1(21.717,25.781) 22.694,25.781 22.987,26.074 22.987,29.441 24.003,30.457 36.941,30.457 38.1,31.616 38.1,42.553 37.886,42.767 37.886,42.992 37.736,43.142 R5.1 37.549,43.103 42.299,43.103 DS1.2 42.374,43.028 48.016,43.028 C3.2
NetC5_1: C5.1 MD1.3 R6.2 SW1.2 | length 24
  Top Layer 1 w0.5: C5.1 7.62,28.971 7.62,31.965 7.913,32.258 9.835,32.258 10.128,32.551 SW1.2 12.812,34.163 12.962,34.013 R6.2 12.962,32.25 v1(13.081,32.131) ; v1(14.605,26.162) 14.728,26.039 16.895,26.039 17.272,26.416 17.272,26.418 17.885,27.031 18.778,27.031 MD1.3
  Bottom Layer 1 w0.5: v1(13.081,32.131) 13.081,27.178 14.097,26.162 v1(14.605,26.162)
NetD1_1: D1.1 Q1.3 | length 6.5
  Bottom Layer 1 w0.5: Q1.3 43.988,20.126 D1.1
NetD1_2: D1.2 R2.1 | length 3.2
  Bottom Layer 1 w0.5: D1.2 43.988,26.868 44.75,27.63 R2.1
NetD2_2: D2.2 R3.1 | length 6.6
  Top Layer 1 w0.5: D2.2 43.218,35.171 R3.1@43.218,39.11
NetD3_2: D3.2 R4.1 | length 3.8
  Top Layer 1 w0.5: D3.2 6.904,24.577 7.054,24.727 R4.1
NetLS1_1: LS1.1 MD1.10 | length 16
  Top Layer 1 w0.5: LS1.1 15.318,17.858 15.801,18.341 MD1.10
NetMD1_6: MD1.6 SW3.2 | length 5.9
  Top Layer 1 w0.5: v2(15.621,22.479) 15.697,22.479 16.639,23.421 MD1.6
  Bottom Layer 1 w0.5: SW3.2 13.638,22.479 v2(15.621,22.479)
NetMD1_8: MD1.8 P1.3 | length 18.3
  Top Layer 1 w0.5: P1.3 3.23,18.678 13.217,18.678 15.24,20.701 18.798,20.701 MD1.8
NetMD1_9: MD1.9 P1.4 | length 18.9
  Top Layer 1 w0.5: P1.4 4.999,17.907 13.843,17.907 15.621,19.685 18.904,19.685 MD1.9
NetMD1_11: MD1.11 R3.2 | length 47.7
  Top Layer 1 w0.5: MD1.11 19.052,17.145 31.623,17.145 v1(32.893,15.875) ; v1(41.402,36.576) 41.618,36.792 R3.2 41.618,40.094 v1@42.291,40.767
  Bottom Layer 1 w0.5: v1(32.893,15.875) 40.467,15.875 40.871,16.279 40.871,26.797 41.402,27.328 v1(41.402,36.576)
  other v1: 42.545,41.021
NetMD1_12: MD1.12 R8.2 | length 32.2
  Top Layer 1 w0.5: MD1.12 23.569,15.801 v1(25.019,14.351)
  Bottom Layer 1 w0.5: v1(25.019,14.351) 37.211,14.351 37.77,14.91 R8.2
NetMD1_13: MD1.13 P3.3 | length 15.9
  Top Layer 1 w0.5: MD1.13 19.178,14.331 20.281,14.331 20.574,14.038 20.574,7.913 20.867,7.62 24.003,7.62 24.557,7.066 P3.3
NetMD1_14: MD1.14 P3.1 | length 10
  Top Layer 1 w0.5: MD1.14 18.978,4.009 19.477,3.51 P3.1
NetMD1_16: MD1.16 P3.2 | length 10.9
  Top Layer 1 w0.5: MD1.16 23.223,12.071 23.223,10.94 23.495,10.668 23.495,10.203 24.173,9.525 v1(24.257,9.525)
  Bottom Layer 1 w0.5: P3.2 22.017,8.301 22.387,8.671 23.194,8.671 24.049,9.525 v1(24.257,9.525)
NetMD1_23: MD1.23 P3.4 | length 11.5
  Top Layer 1 w0.5: P3.4 27.097,5.468 27.598,5.969 28.702,5.969 31.923,9.19 MD1.23
NetMD1_25: MD1.25 R7.2 SW2.2 | length 11.8
  Top Layer 1 w0.5: MD1.25 36.528,13.261 36.728,13.061 36.728,11.151 v1(37.846,10.033)
  Bottom Layer 1 w0.5: v1(37.846,10.033) 37.884,9.995 40.521,9.995 R7.2 44.932,9.957 45.082,10.107 SW2.2
NetMD1_26: MD1.26 R1.2 U2.4 | length 50.7
  Top Layer 1 w0.5: MD1.26 38.915,14.531 39.243,14.859 v1(39.243,17.145) ; v1(36.195,47.244) 35.052,46.101 35.052,38.354 35.641,37.765 36.687,37.765 39.251,35.201 v1(39.251,33.559)
  Bottom Layer 1 w0.5: U2.4 26.525,46.718 28.067,48.26 32.882,48.26 R1.2 35.648,48.398 35.941,48.105 v1@35.941,47.371 ; v1@39.243,17.399 39.251,17.407 v1(39.251,33.559)
NetMD1_30: MD1.30 P1.5 | length 36.6
  Top Layer 1 w0.5: P1.5 11.557,12.446 v1(12.573,13.462) ; v1(33.02,19.177) 33.138,19.295 34.925,19.295 35.041,19.411 35.778,19.411 MD1.30
  Bottom Layer 1 w0.5: v1(12.573,13.462) 15.367,16.256 29.845,16.256 32.512,18.923 v1@32.893,18.923
NetMD1_31: MD1.31 P1.6 | length 38.4
  Top Layer 1 w0.5: P1.6 3.937,9.906 v1(4.699,10.668) ; v1(33.02,20.828) 33.046,20.854 35.952,20.854 MD1.31
  Bottom Layer 1 w0.5: v1(4.699,10.668) 14.859,20.828 v1(33.02,20.828)
NetMD1_33: MD1.33 P2.4 | length 16.6
  Top Layer 1 w0.5: MD1.33 41.833,23.421 43.029,22.225 48.133,22.225 49.804,23.896 51.247,23.896 P2.4
NetMD1_36: MD1.36 P2.3 | length 16.2
  Top Layer 1 w0.5: MD1.36 41.695,27.231 42.404,27.94 47.371,27.94 48.641,26.67 51.227,26.67 P2.3
NetP4_2: P4.2
NetP4_3: P4.3
NetQ1_2: Q1.2 R8.1 | length 7.2
  Bottom Layer 1 w0.5: Q1.2 44.75,16.803 45.043,16.51 R8.1
pads on no net: MD1.5 MD1.7 MD1.17 MD1.18 MD1.19 MD1.20 MD1.21 MD1.22 MD1.24 MD1.27 MD1.28 MD1.29 MD1.32 MD1.34 MD1.35 MD1.37 U2.1 U2.2 U2.6 U2.7 U2.8

## Polygon pours and split planes (outlines as drawn)
+3.3 on Bottom Layer "+3.3" (solid, pour order 1): 13.081,49.953 13.081,48.768 13.081,0 54.721,0 55.096,0.375 55.096,49.953
+5 on Bottom Layer "+5_L03_P002" (solid, pour order 2): 0,49.784 12.827,49.784 12.954,49.657 12.7,49.403 12.7,0.127 0.127,0.127
GND on Top Layer "GND_L02_P000" (solid, pour order 0): 0,49.911 0,0 55.127,0 55.127,50.051

## Silkscreen, mask and mechanical layers (free items; w line width, h text height)
Mechanical 1:
  lines w0.254: 55,0 0,0 0,50 55,50 55,0.254